# Altium PCB ActuatorMKII.PcbDoc (part 2 of 3)
Units mil, origin at the board's own origin, x right, y up, seen from the top; angles counter-clockwise.
Board outline 7000 x 5000 mil, 4 copper layers (Top Layer, Middle 1 Layer, Middle 2 Layer, Bottom Layer), stack 53.912 mil thick; 139 components, 107 nets, 485 pads, 302 vias.
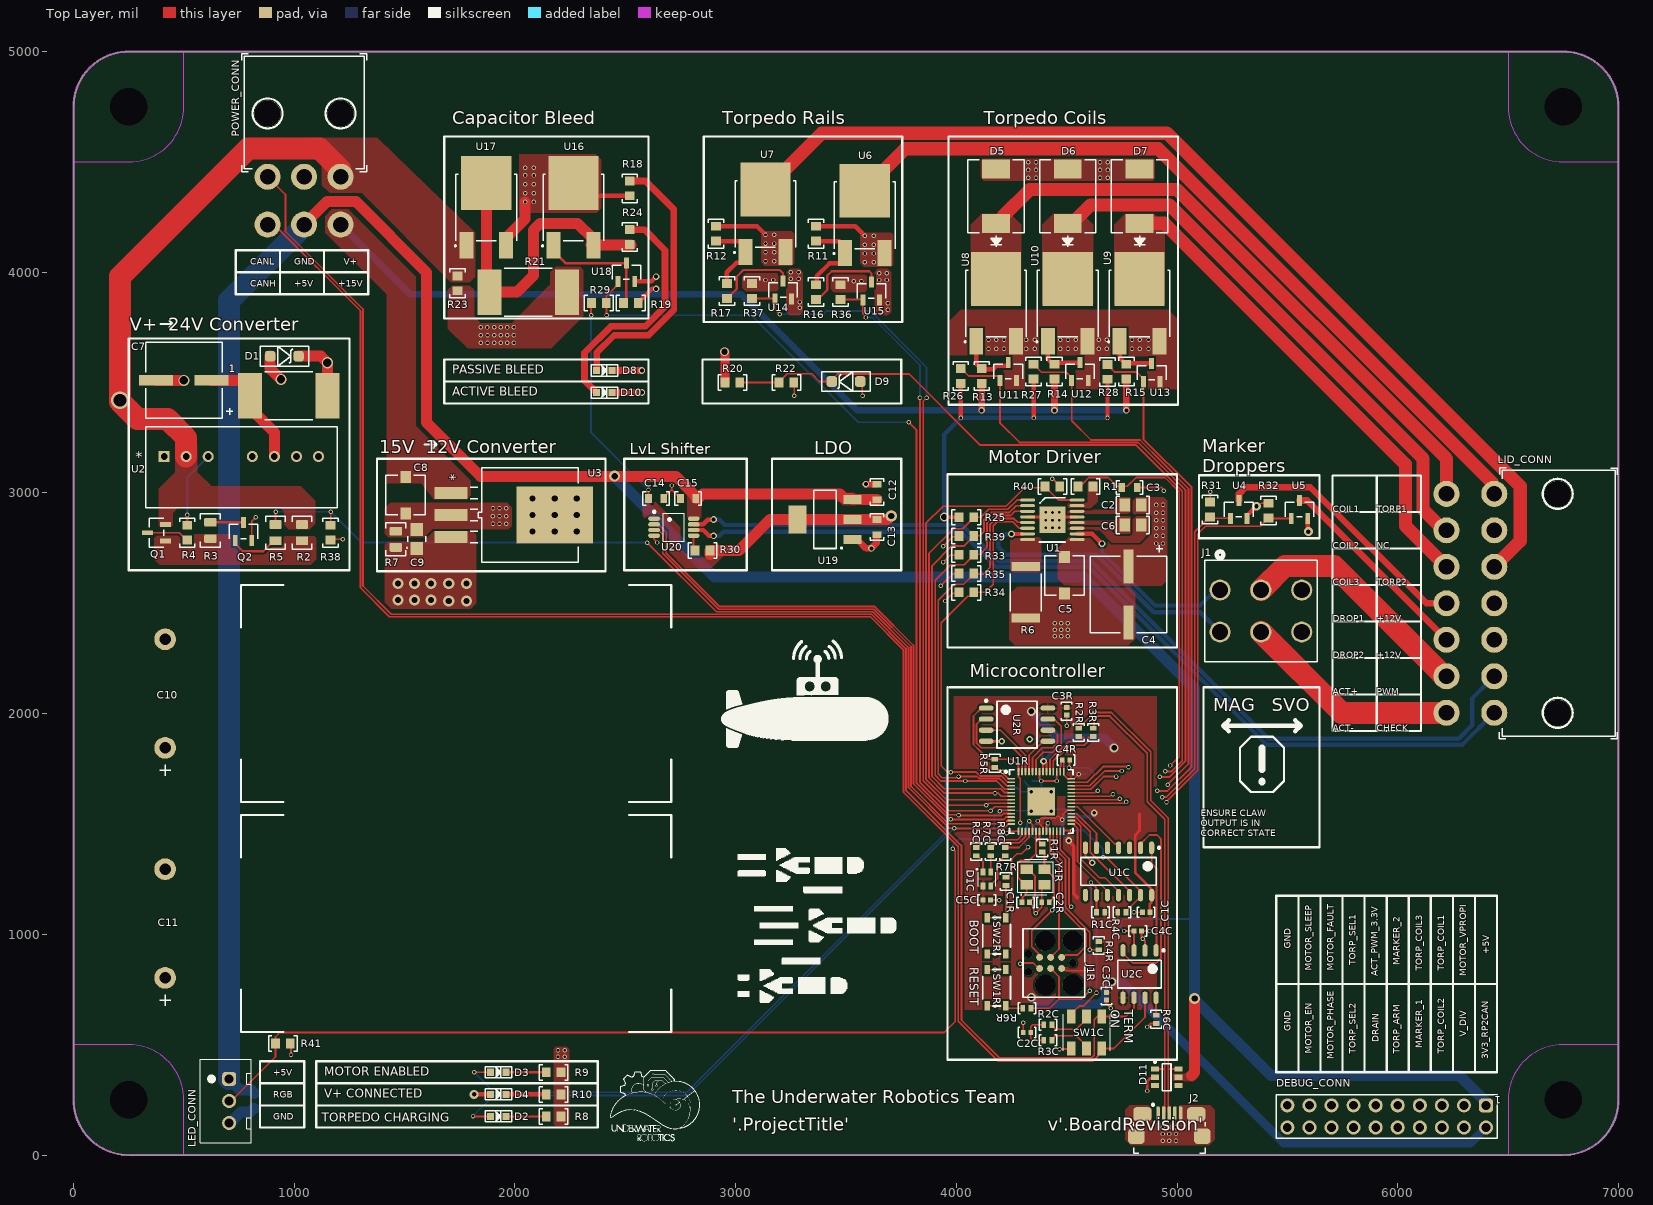
[diagram p0: Top Layer view]

## Via types
v1: diameter 20, hole 12, Top Layer to Bottom Layer, tented both sides, 244 vias
v2: diameter 50, hole 28, Top Layer to Bottom Layer, tented both sides, 22 vias
v3: diameter 30, hole 18, Top Layer to Bottom Layer, tented both sides, 13 vias
v4: diameter 30, hole 16, Top Layer to Bottom Layer, tented both sides, 10 vias
v5: diameter 40, hole 25, Top Layer to Bottom Layer, tented both sides, 4 vias
v6: diameter 40, hole 20, Top Layer to Bottom Layer, tented both sides, 3 vias
v7: diameter 50, hole 38, Top Layer to Bottom Layer, tented both sides, 3 vias
v8: diameter 40, hole 28, Top Layer to Bottom Layer, tented both sides, 2 vias
v9: diameter 80, hole 58, Top Layer to Bottom Layer, tented both sides, 1 vias

## Nets (pads, with @x,y where several pads share a name; then routed paths per layer and width w, separated by ;. In a path a pad name is that pad's centre, name@x,y a point inside that pad or via, vN(x,y) a via of type N, cw(c..) or ccw(c..) an arc to the next point about the centre after c; other vN are vias at no path point) (continued)
+24V: (continued)
  other v1: 3585.04,4045.1 3625.04,4045.1 3135.04,4050.1 3175.04,4050.1 3585.04,4085.1 3625.04,4085.1 3135.04,4090.1 3175.04,4090.1 3585.04,4125.1 3625.04,4125.1 3135.04,4130.1 3175.04,4130.1 3625.04,4165.1 3175.04,4170.1 2085.87,4318.75 2045.87,4358.75 2085.87,4358.75 2045.87,4398.75 2085.87,4398.75 4325.87,4428.75 4360.87,4428.75 4650.87,4428.75 4685.87,4428.75 2045.87,4438.75 2085.87,4438.75 4325.87,4463.75 4360.87,4463.75 4650.87,4463.75 4685.87,4463.75 2045.87,4473.75 2085.87,4473.75 4325.87,4498.75 4360.87,4498.75 4650.87,4498.75 4685.87,4498.75
ACT+: J1.2 LID_CONN.14 | length 992.7
  Top Layer w100: J1.2@5380,2370 5746.06,2003.94 LID_CONN.14@6221.06,2003.94
ACT-: J1.5 LID_CONN.13 | length 1094
  Top Layer w100: J1.5@5380,2560.16 5489.84,2670 5710,2670 6201.65,2178.35 6207.11,2178.35 6216.16,2169.29 LID_CONN.13@6221.06,2169.29
ACT_CHECK_3.3V: U1R.13 U20.3 | length 2597.1
  Top Layer w8: U20.3@2630.43,2832.2 2649.64,2832.2 2670,2811.84 2670,2726.26 2922.76,2473.5 3625.24,2473.5 3794.5,2304.24 3794.5,1670.5 3963.5,1501.5 4215.03,1501.5 4228.98,1515.45 4249.1,1515.45 U1R.13@4249.17,1515.51
ACT_CHECK_5V: LID_CONN.7 U20.6 | length 4106.9
  Top Layer w20: U20.6@2809.57,2832.2 2852.8,2832.2 2878.18,2806.82 2898.97,2806.82 v3(2899.93,2805.86)
  Bottom Layer w20: v3(2899.93,2805.86) 2900.79,2805 2926.17,2805 2946.17,2825 4020,2825 4180,2665 4600,2665 5405,1860 6293.66,1860 LID_CONN.7@6437.6,2003.94
ACT_PWM_3.3V: DEBUG_CONN.11 U1R.12 U20.2 | length 6375.6
  Top Layer w8: U20.2@2630.43,2857.8 2649.64,2857.8 2685,2822.43 2685,2727.53 2927.53,2485 3630,2485 3806,2309 3806,1682.94 3958.94,1530 3962.98,1530 3971.48,1521.5 v1(3974.73,1521.5) ; v1@3975,1523.8 3978.8,1520 4213.73,1520 4224.93,1531.2 4249.1,1531.2 U1R.12@4249.17,1531.26
  Middle 2 Layer w8: v1(3974.73,1521.5) 3972.43,1523.8 3966.2,1523.8 3965.53,1524.47 3928.21,1524.47 3851,1447.26 3851,729.2 4164.2,416 4880.8,416 5269.8,805 5836.61,805 5933,708.61 5933,359.26 5900,326.26 DEBUG_CONN.11@5900,235
ACT_PWM_5V: LID_CONN.6 U20.7 | length 4223.9
  Top Layer w20: U20.7@2809.57,2857.8 2852.8,2857.8 2873.18,2878.18 2898.18,2878.18 v3(2900,2880)
  Bottom Layer w20: v3(2900,2880) 2901.91,2878.09 2926.91,2878.09 2950,2855 4025,2855 4190,2690 4610,2690 5414,1886 6276,1886 6336.94,1946.94 6336.94,2068.63 6415,2146.69 LID_CONN.6@6415,2165
CANCLK_RP2CAN: U1C.6 U1R.32 | length 217.3
  Top Layer w8: U1R.32@4519.83,1547.01 4519.9,1546.94 4545.34,1546.94 4635,1457.28 U1C.6@4635,1392.28
CANH: POWER_CONN.4 SW1C.4 U2C.7 | length 7300.4
  Top Layer w8: POWER_CONN.4@879.29,4216.06 908.94,4216.06 1300,3825 1300,2570 1431,2439 3610.95,2439 3760,2289.95 3760,1645.2 4009,1396.2 4009,606 4188.33,426.67 4619.63,426.67 4643.21,450.26 4643.21,466.48 SW1C.4@4658.9,482.17 4712.17,482.17 4855,625 U2C.7@4855,712.72
CANL: POWER_CONN.1 SW1C.1 U2C.6 | length 7486.2
  Top Layer w8: POWER_CONN.1@879.29,4432.6 960,4351.89 960,4184.8 1311.5,3833.3 1311.5,2578.3 1439.3,2450.5 3615.71,2450.5 3771.5,2294.71 3771.5,1653.5 4023,1402 4023,611.8 4194.13,440.67 4613.83,440.67 4625.21,452.05 4625.21,613.83 4639.21,627.83 SW1C.1@4658.9,627.83 4767.83,627.83 4805,665 U2C.6@4805,712.72